# Altium PCB FPGA_Peripheral_Board.PcbDoc (part 4 of 5)
Units mm, origin at the board's own origin, x right, y up, seen from the top; angles counter-clockwise.
Board outline 78.8 x 69 mm, 4 copper layers (Top Layer, Int1 (GND), Int2 (PWR), Bottom Layer), stack 1.508 mm thick; 111 components, 280 nets, 1262 pads, 728 vias.
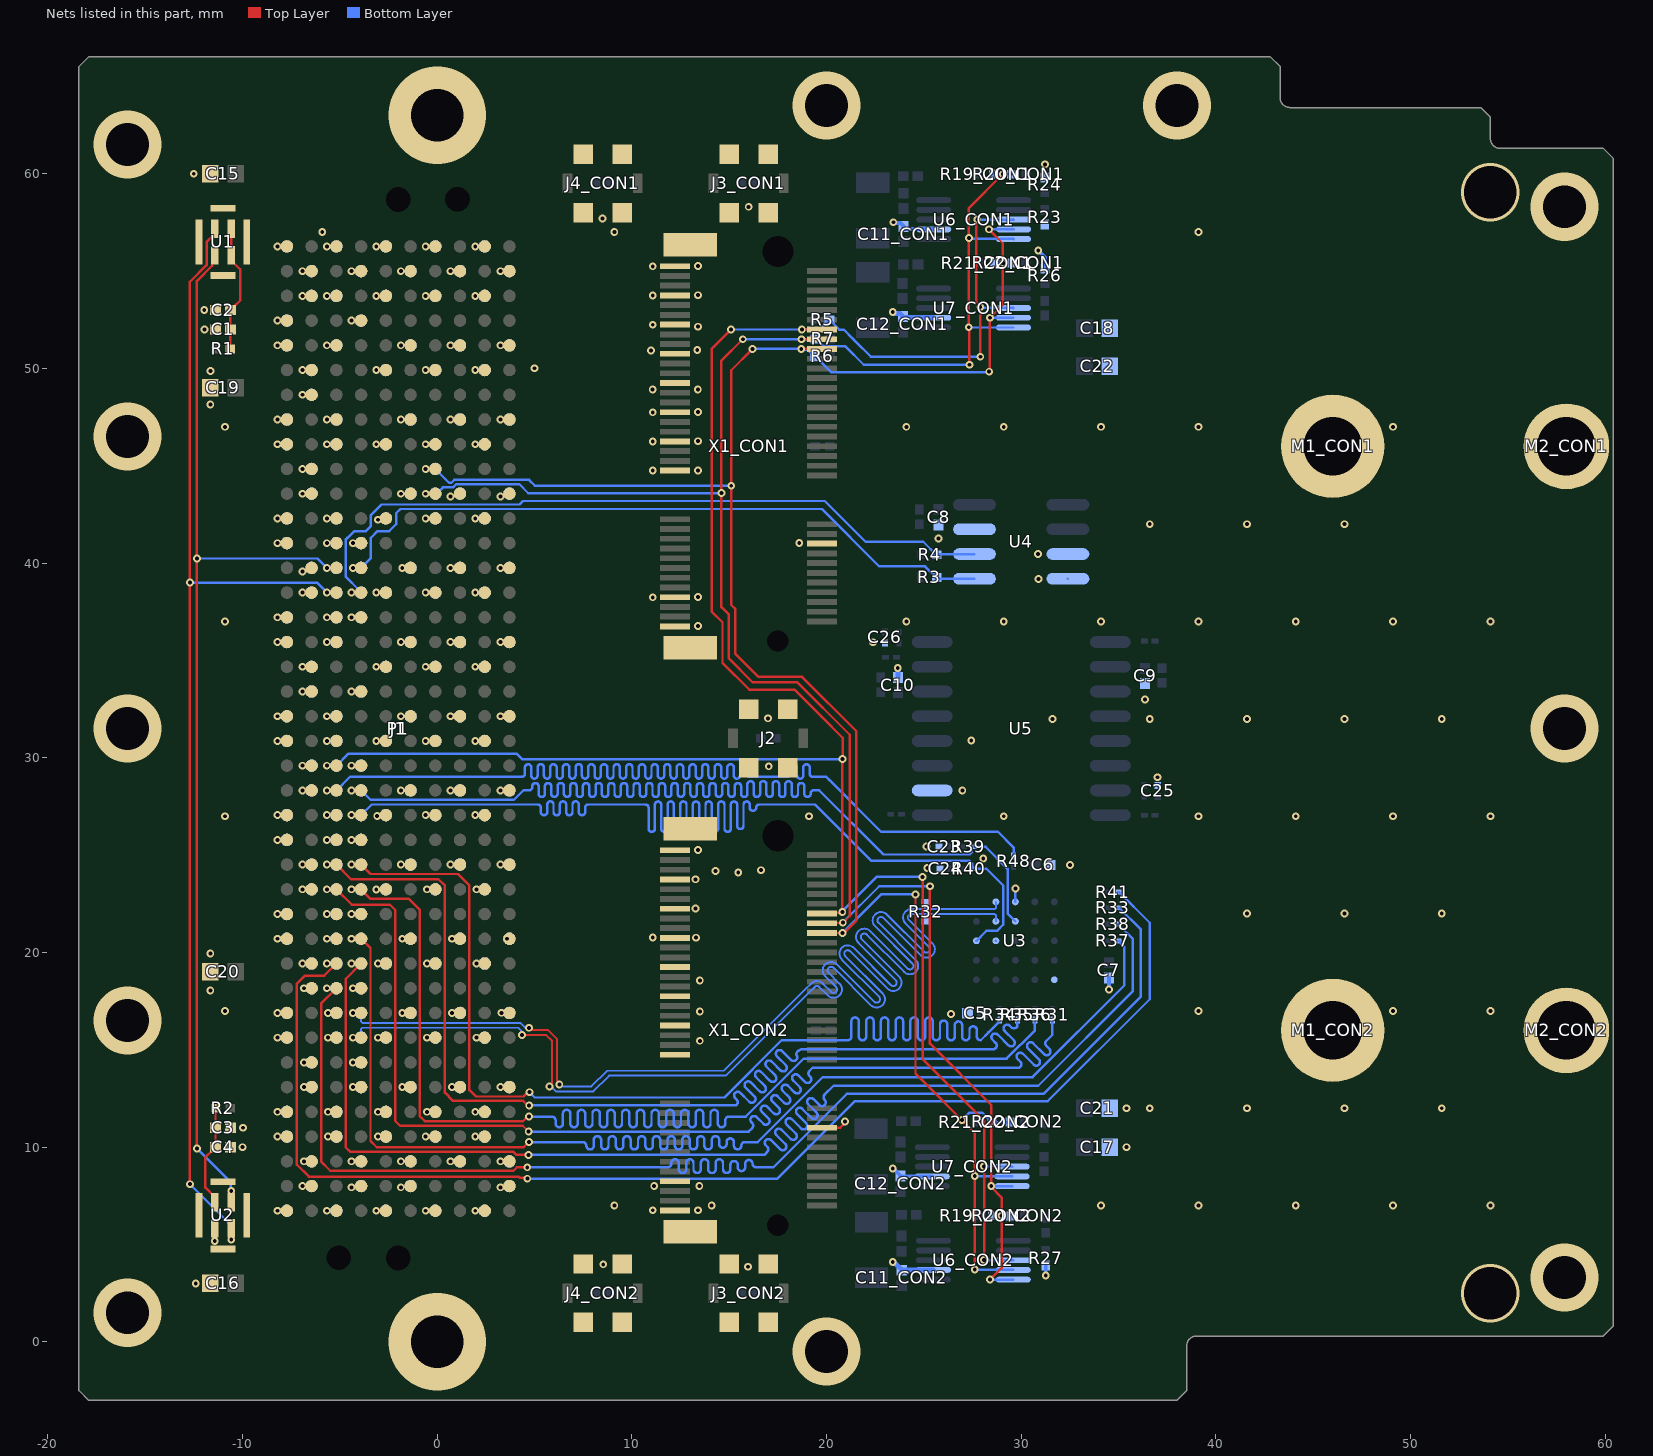
[diagram p5: the nets of this part, all layers, seen from the top]

## Via types
v1: diameter 0.4, hole 0.2, Top Layer to Bottom Layer, tented both sides, 713 vias
v2: diameter 3.5, hole 2.2, Top Layer to Bottom Layer, 11 vias
v3: diameter 5, hole 2.7, Top Layer to Bottom Layer, tented both sides, 2 vias
v4: diameter 3, hole 2.7, Top Layer to Bottom Layer, 1 vias
v5: diameter 3, hole 2.7, Top Layer to Bottom Layer, tented both sides, 1 vias

## Nets (pads, with @x,y where several pads share a name; then routed paths per layer and width w, separated by ;. In a path a pad name is that pad's centre, name@x,y a point inside that pad or via, vN(x,y) a via of type N, cw(c..) or ccw(c..) an arc to the next point about the centre after c; other vN are vias at no path point) (continued)
GND: C1.1 C2.1 C3.1 C4.1 C5.1 C6.1 C7.1 C8.1 C9.1 C10.1 C11_CON1.1 C11_CON2.1 C12_CON1.1 C12_CON2.1 C15.1 C16.1 C17.1 C18.1 C19.1 C20.1 C21.1 C22.1 C23.2 C24.2 C25.2 C26.2 J1.A1 J1.A4 J1.A5 J1.A8 J1.A9 J1.A12 J1.A13 J1.A16 J1.A17 J1.A20 J1.A21 J1.A24 J1.A25 J1.A28 J1.A29 J1.A32 J1.A33 J1.A36 J1.A37 J1.A40 J1.B2 J1.B3 J1.B6 J1.B7 J1.B10 J1.B11 J1.B14 J1.B15 J1.B18 J1.B19 J1.B22 J1.B23 J1.B26 J1.B27 J1.B30 J1.B31 J1.B34 J1.B35 J1.B38 J1.B39 J1.C1 J1.C4 J1.C5 J1.C8 J1.C9 J1.C12 J1.C13 J1.C16 J1.C17 J1.C20 J1.C21 J1.C24 J1.C25 J1.C28 J1.C29 J1.C32 J1.C33 J1.C36 J1.C38 J1.C40 J1.D2 J1.D3 J1.D6 J1.D7 J1.D10 J1.D13 J1.D16 J1.D19 J1.D22 J1.D25 J1.D28 J1.D37 J1.D39 J1.E1 J1.E4 J1.E5 J1.E8 J1.E11 J1.E14 J1.E17 J1.E20 J1.E23 J1.E26 J1.E29 J1.E32 J1.E35 J1.E38 J1.E40 J1.F2 J1.F3 J1.F6 J1.F9 J1.F12 J1.F15 J1.F18 J1.F21 J1.F24 J1.F27 J1.F30 J1.F33 J1.F36 J1.F39 J1.G1 J1.G4 J1.G5 J1.G8 J1.G11 J1.G14 J1.G17 J1.G20 J1.G23 J1.G26 J1.G29 J1.G32 J1.G35 J1.G38 J1.G40 J1.H3 J1.H6 J1.H9 J1.H12 J1.H15 J1.H18 J1.H21 J1.H24 J1.H27 J1.H30 J1.H33 J1.H36 J1.H39 J1.J1 J1.J4 J1.J5 J1.J8 J1.J11 J1.J14 J1.J17 J1.J20 J1.J23 J1.J26 J1.J29 J1.J32 J1.J35 J1.J38 J1.J40 J1.K2 J1.K3 J1.K6 J1.K9 J1.K12 J1.K15 J1.K18 J1.K21 J1.K24 J1.K27 J1.K30 J1.K33 J1.K36 J1.K39 J2.3 J2.4 J2.5 J2.6 J3_CON1.3 J3_CON1.4 J3_CON1.5 J3_CON1.6 J3_CON2.3 J3_CON2.4 J3_CON2.5 J3_CON2.6 J4_CON1.3 J4_CON1.4 J4_CON1.5 J4_CON1.6 J4_CON2.3 J4_CON2.4 J4_CON2.5 J4_CON2.6 M1_CON1.1 M1_CON2.1 M2_CON1.1 M2_CON2.1 P1.A1 P1.A4 P1.A5 P1.A8 P1.A9 P1.A12 P1.A13 P1.A16 P1.A17 P1.A20 P1.A21 P1.A24 P1.A25 P1.A28 P1.A29 P1.A32 P1.A33 P1.A36 P1.A37 P1.A40 P1.B2 P1.B3 P1.B6 P1.B7 P1.B10 P1.B11 P1.B14 P1.B15 P1.B18 P1.B19 P1.B22 P1.B23 P1.B26 P1.B27 P1.B30 P1.B31 P1.B34 P1.B35 P1.B38 P1.B39 P1.C1 P1.C4 P1.C5 P1.C8 P1.C9 P1.C12 P1.C13 P1.C16 P1.C17 P1.C20 P1.C21 P1.C24 P1.C25 P1.C28 P1.C29 P1.C32 P1.C33 P1.C36 P1.C38 P1.C40 P1.D2 P1.D3 P1.D6 P1.D7 P1.D10 P1.D13 P1.D16 P1.D19 P1.D22 P1.D25 P1.D28 P1.D37 P1.D39 P1.E1 P1.E4 P1.E5 P1.E8 P1.E11 P1.E14 P1.E17 P1.E20 P1.E23 P1.E26 P1.E29 P1.E32 P1.E35 P1.E38 P1.E40 P1.F2 P1.F3 P1.F6 P1.F9 P1.F12 P1.F15 P1.F18 P1.F21 P1.F24 P1.F27 P1.F30 P1.F33 P1.F36 P1.F39 P1.G1 P1.G4 P1.G5 P1.G8 P1.G11 P1.G14 P1.G17 P1.G20 P1.G23 P1.G26 P1.G29 P1.G32 P1.G35 P1.G38 P1.G40 P1.H3 P1.H6 P1.H9 P1.H12 P1.H15 P1.H18 P1.H21 P1.H24 P1.H27 P1.H30 P1.H33 P1.H36 P1.H39 P1.J1 P1.J4 P1.J5 P1.J8 P1.J11 P1.J14 P1.J17 P1.J20 P1.J23 P1.J26 P1.J29 P1.J32 P1.J35 P1.J38 P1.J40 P1.K2 P1.K3 P1.K6 P1.K9 P1.K12 P1.K15 P1.K18 P1.K21 P1.K24 P1.K27 P1.K30 P1.K33 P1.K36 P1.K39 R23.1 R24.1 R26.1 R27.1 U1.5 U2.2 U2.5 U3.B3 U3.C1 U3.E5 U4.3 U4.4 U4.7 U5.10 U6_CON1.7 U6_CON2.7 U7_CON1.7 U7_CON2.7 X1_CON1.1 X1_CON1.7 X1_CON1.18 X1_CON1.33 X1_CON1.39 X1_CON1.45 X1_CON1.51 X1_CON1.57 X1_CON1.63 X1_CON1.69 X1_CON1.75 X1_CON1.76 X1_CON1.77 X1_CON2.1 X1_CON2.7 X1_CON2.18 X1_CON2.33 X1_CON2.39 X1_CON2.45 X1_CON2.51 X1_CON2.57 X1_CON2.63 X1_CON2.69 X1_CON2.75 X1_CON2.76 X1_CON2.77 | length 15
  Top Layer w0.125: X1_CON1.69@12.206,53.731 X1_CON1.69@12.225,53.75 ; J2.4@16,32.5 J2.4@16.437,32.062 ; X1_CON2.18@19.775,11 20.7,11 20.948,11.248 v1(20.948,11.313)
  Top Layer w0.2: v1(-11.425,5.175) U2.2@-11.425,5.825
  Bottom Layer w0.125: U3.B3@28.697,20.597 U3.B3@28.7,20.6 ; U3.C1@29.7,22.6 29.704,22.604 29.704,23.288 v1(29.707,23.292) ; v1(30.888,39.177) v1@30.897,39.186 ; U4.4@32.391,39.186 U4.4@32.4,39.195
  Bottom Layer w0.2: v1(23.4,8.9) 23.437,8.9 23.803,8.534 C12_CON2.1@23.803,8.514 23.81,8.507 25.425,8.507 U7_CON2.7@25.432,8.5 ; v1(23.432,57.509) 23.47,57.471 23.8,57.471 23.96,57.311 C11_CON1.1@23.96,57.291 24.089,57.162 25.487,57.162 U6_CON1.7@25.506,57.143 ; v1(30.872,56.055) 31.227,55.7 31.227,55.137 R26.1@31.215,55.125 ; v1(31.262,3.417) R27.1@31.262,3.928 ; v1(34.502,18.102) C7.1@34.502,18.693 ; v1(37,29) v1@37.006,28.994 ; C25.2@37.006,28.598 37,28.593 C25.2@37.011,28.581
  Bottom Layer w0.25: v1(23.401,52.899) 23.441,52.899 23.527,52.814 23.787,52.814 23.922,52.679 C12_CON1.1@23.922,52.659 23.971,52.61 25.49,52.61 U7_CON1.7@25.5,52.6 ; v1(23.403,4.105) 23.457,4.105 23.863,3.699 C11_CON2.1@23.863,3.679 23.872,3.688 25.483,3.688 U6_CON2.7@25.492,3.697 ; v1(23.658,34.615) 23.662,34.611 23.662,34.128 C10.1@23.665,34.125
  other v1: -12.4,3 15.968,3.857 8.53,3.982 -8.2,6.735 -5.665,6.735 -3.126,6.735 -0.59,6.735 1.96,6.735 11.072,6.763 13.392,6.763 9.1,7 14.1,7 34.1,7 39.1,7 44.1,7 49.1,7 54.1,7 -4.395,7.938 -1.865,7.938 3.25,7.938 -6.92,8.005 11.147,8.013 13.467,8.013 -6.837,9.275 -4.395,9.275 -1.865,9.275 0.68,9.275 3.25,9.275 -10,10 35.4,10 -8.2,10.545 -5.6,10.545 -3.037,10.545 -0.59,10.545 1.96,10.545 -9.967,11 -8.2,11.815 -5.6,11.815 -3.037,11.815 -0.52,11.815 1.96,11.815 35.4,12 36.6,12 41.6,12 46.6,12 51.6,12 -6.837,13.085 -4.33,13.085 -1.79,13.085 0.763,13.085 3.25,13.085 -6.837,14.355 -4.33,14.355 13.492,15.463 -8.2,15.625 -5.6,15.625 -3.037,15.625 -0.52,15.625 2.02,15.625 26.388,16.834 -8.2,16.895 -5.6,16.895 -1.79,16.895 0.763,16.895 3.305,16.9 13.492,16.963 -10.9,17 39.1,17 49.1,17 54.1,17 -11.65,18.05 -6.837,18.165 -4.33,18.165 13.492,18.563 -6.92,19.435 -3.037,19.435 -0.52,19.435 2.02,19.435 -11.65,19.95 -8.2,20.705 -5.665,20.705 -1.79,20.705 0.763,20.705 3.595,20.705 13.293,20.761 11.072,20.763 -8.2,21.975 -5.665,21.975 -4.395,21.975 41.6,22 46.6,22 51.6,22 13.269,22.255 -6.92,23.245 -3.126,23.237 -0.52,23.245 2.02,23.245 13.269,23.759 15.466,24.108 14.297,24.186 16.639,24.229 25.171,24.341 -6.92,24.515 -1.865,24.515 0.68,24.515 3.25,24.515 32.5,24.5 28.048,24.826 13.392,25.263 25.139,25.448 -8.2,25.785 -5.665,25.785 -4.395,25.785 -10.9,27 -3.079,27.008 19.1,27 29.1,27 39.1,27 44.1,27 49.1,27 54.1,27 -8.2,27.055 -5.665,27.055 -0.59,27.055 1.96,27.055 -6.92,28.325 -1.865,28.325 0.68,28.325 3.25,28.325 26.975,28.325 17.032,29.563 -6.92,29.595 -4.395,29.595 -8.2,30.865 -5.665,30.865 -3.126,30.865 -0.59,30.865 1.96,30.865 27.434,30.889 31.6,32 36.6,32 41.6,32 46.6,32 51.6,32 17,32.027 -8.2,32.135 -5.665,32.135 -1.865,32.135 0.68,32.135 3.25,32.135 36.356,32.996 -6.92,33.405 -4.395,33.405 -6.92,34.675 -3.126,34.675 -0.59,34.675 1.96,34.675 -8.2,35.945 -5.665,35.945 -1.865,35.945 0.68,35.945 3.25,35.945 22.383,35.94 13.392,36.763 -10.9,37 24.1,37 29.1,37 34.1,37 39.1,37 44.1,37 49.1,37 54.1,37 -8.2,37.215 -5.665,37.215 -4.395,37.215 11.072,38.243 13.392,38.263 -6.92,38.485 -3.126,38.485 -0.59,38.485 1.96,38.485 -6.912,39.565 -1.79,39.755 0.68,39.755 3.25,39.755 30.865,40.465 -8.2,41.025 -5.665,41.025 -4.323,41.025 18.6,41.03 25.758,41.258 36.6,42 41.6,42 46.6,42 -3.037,42.228 -8.2,42.295 -5.665,42.295 -0.59,42.295 1.96,42.295 0.68,43.422 3.25,43.422 -6.92,43.565 -1.865,43.565 11.072,44.763 13.392,44.763 -6.92,44.835 -8.2,46.105 -5.665,46.105 -3.126,46.105 -0.59,46.105 1.96,46.105 11.072,46.243 13.392,46.263 -10.9,47 24.1,47 29.1,47 34.1,47 39.1,47 49.1,47 -8.2,47.375 -5.665,47.375 -1.865,47.375 0.68,47.375 3.25,47.375 11.072,47.743 13.392,47.763 -11.65,48.15 -6.92,48.645 11.069,48.916 13.39,48.916 -11.639,49.861 -6.92,49.915 -3.126,49.915 -0.59,49.915 1.96,49.915 5.006,50.009 10.983,50.922 13.36,50.945 -8.2,51.185 -5.665,51.185 -1.865,51.185 0.68,51.185 3.25,51.185 -11.945,52 13.392,52.144 11.072,52.243 -8.2,52.455 -4.395,52.455 -11.964,53 -6.92,53.725 -5.665,53.725 -3.126,53.725 -0.59,53.725 1.96,53.725 11.072,53.743 13.392,53.763 -6.92,54.995 -4.395,54.995 -1.865,54.995 0.68,54.995 3.25,54.995 11.072,55.243 13.392,55.263 -8.2,56.265 -5.665,56.265 -3.126,56.265 -0.59,56.265 1.96,56.265 -5.9,57 9.1,57 39.1,57 8.5,57.7 16,58.3 -12.5,60 31.214,60.484
  other v2: 20,-0.5 -15.9,1.5 57.9,3.3 -15.9,16.5 -15.9,31.5 57.9,31.5 -15.9,46.5 57.9,58.3 -15.9,61.5 20,63.5 38,63.5
  other v3: 0,0 0,63
  other v4: 54.1,2.5
  other v5: 54.1,59.05
HYPER_CK_N: J1.D9 P1.D9 R32.1 U3.B1 | length 65
  Top Layer w0.1: v1(4.713,16.131) 4.795,16.131 4.916,16.01 5.706,16.01 6.15,15.565 6.15,13.426 6.275,13.301 v1(6.275,13.22)
  Bottom Layer w0.1: P1.D9@-3.905,16.895 -3.905,16.444 -3.846,16.385 4.265,16.385 4.5,16.15 4.694,16.15 v1(4.713,16.131) ; v1(6.275,13.22) 6.356,13.22 6.456,13.12 7.92,13.12 8.727,13.927 14.729,13.927 18.805,18.003 18.928,18.126 cw(c19.017,18.038) 18.929,18.127 19.207,18.404 cw(c19.509,18.103) 19.77,18.442 19.775,18.442 19.811,18.406 cw(c19.509,18.103) 19.812,18.404 20.237,17.98 ccw(c20.362,18.104) 20.487,17.979 ccw(c20.362,18.104) 20.488,18.229 ; 20.487,18.23 19.932,18.785 cw(c20.233,19.088) 19.931,19.39 cw(c20.233,19.088) 20.536,19.389 22.448,17.477 ccw(c22.574,17.601) 22.699,17.476 ; 21.39,20.243 ccw(c21.087,19.942) 20.785,20.244 ccw(c21.087,19.942) 20.786,19.639 22.698,17.727 ; 21.39,20.243 23.302,18.331 ; 22.699,17.726 cw(c22.574,17.601) 22.699,17.476 ; 23.303,18.33 ccw(c23.428,18.455) 23.553,18.33 ; 23.552,18.581 21.64,20.494 cw(c21.941,20.796) 21.639,21.098 cw(c21.941,20.796) 22.244,21.098 24.156,19.185 ccw(c24.282,19.309) 24.407,19.184 ; 23.554,18.33 ccw(c23.428,18.455) 23.553,18.58 ; 24.407,19.435 22.494,21.348 cw(c22.796,21.65) 22.494,21.952 cw(c22.796,21.65) 23.098,21.952 25.011,20.039 ccw(c25.136,20.164) 25.262,20.039 ccw(c25.136,20.164) 25.262,20.289 24.055,21.495 cw(c24.356,21.798) 24.356,22.225 24.604,22.225 28.641,22.225 28.7,22.284 U3.B1@28.7,22.6 ; 24.408,19.185 ccw(c24.282,19.309) 24.407,19.435
  other v1: -4.33,16.895
HYPER_CK_P: J1.D8 P1.D8 R32.2 U3.B2 | length 65.3
  Top Layer w0.1: v1(4.36,15.76) 5.602,15.76 5.9,15.462 5.9,13.321 5.775,13.196 v1(5.775,13.115)
  Bottom Layer w0.1: P1.D8@-3.905,15.625 -3.905,16.076 -3.846,16.135 4.161,16.135 4.323,15.973 4.323,15.796 v1(4.36,15.76) ; v1(5.775,13.115) 5.849,13.115 6.094,12.87 8.024,12.87 8.83,13.677 14.833,13.677 18.982,17.826 19.105,17.949 ccw(c19.017,18.038) 19.106,17.95 19.384,18.227 cw(c19.509,18.103) 19.635,18.227 20.06,17.803 ccw(c20.362,18.104) 20.664,17.802 ccw(c20.362,18.104) 20.664,18.407 20.109,18.962 ; 20.108,18.962 cw(c20.233,19.088) 20.107,19.213 ; 20.108,19.213 cw(c20.233,19.088) 20.358,19.213 ; 20.359,19.212 22.271,17.3 ccw(c22.574,17.601) 22.876,17.299 ccw(c22.574,17.601) 22.875,17.904 20.963,19.816 ; 20.962,20.067 ccw(c21.087,19.942) 20.962,19.816 ; 20.962,20.068 cw(c21.087,19.942) 21.212,20.067 ; 21.213,20.066 23.126,18.154 ccw(c23.428,18.455) 23.73,18.153 ccw(c23.428,18.455) 23.729,18.758 21.817,20.67 cw(c21.941,20.796) 21.816,20.921 ; 21.817,20.922 cw(c21.941,20.796) 22.067,20.921 ; 22.067,20.92 23.98,19.008 ccw(c24.282,19.309) 24.584,19.008 ccw(c24.282,19.309) 24.584,19.612 22.671,21.525 cw(c22.796,21.65) 22.67,21.775 ; 22.671,21.776 cw(c22.796,21.65) 22.921,21.776 ; 22.922,21.775 24.834,19.862 ccw(c25.136,20.164) 25.438,19.861 ccw(c25.136,20.164) 25.438,20.466 ; 25.438,20.466 24.232,21.672 cw(c24.356,21.798) 24.356,21.975 24.854,21.975 28.641,21.975 28.7,21.916 U3.B2@28.7,21.6
  other v1: -4.33,15.625
HYPER_CSN0: J1.D18 P1.D18 R39.1 U3.C2 | length 64.7
  Bottom Layer w0.125: P1.D18@-3.905,28.325 -3.905,28.205 -3.785,28.205 -3.423,27.842 3.942,27.842 4.434,28.334 4.723,28.334 ccw(c4.723,28.497) 4.885,28.497 4.885,28.543 cw(c5.048,28.543) 5.048,28.705 cw(c5.048,28.543) 5.21,28.543 5.21,28.152 ccw(c5.373,28.152) 5.373,27.989 ccw(c5.373,28.152) 5.535,28.152 5.535,28.543 cw(c5.698,28.543) 5.698,28.705 cw(c5.698,28.543) 5.86,28.543 5.86,28.152 ccw(c6.023,28.152) 6.023,27.989 ccw(c6.023,28.152) 6.185,28.152 6.185,28.543 cw(c6.348,28.543) 6.348,28.705 cw(c6.348,28.543) 6.51,28.543 6.51,28.152 ccw(c6.673,28.152) 6.673,27.989 ccw(c6.673,28.152) 6.835,28.152 6.835,28.543 cw(c6.998,28.543) 6.998,28.705 cw(c6.998,28.543) 7.16,28.543 7.16,28.152 ccw(c7.323,28.152) 7.323,27.989 ccw(c7.323,28.152) 7.485,28.152 7.485,28.543 cw(c7.648,28.543) 7.648,28.705 cw(c7.648,28.543) 7.81,28.543 7.81,28.152 ccw(c7.973,28.152) 7.973,27.989 ccw(c7.973,28.152) 8.135,28.152 8.135,28.543 cw(c8.298,28.543) 8.298,28.705 cw(c8.298,28.543) 8.46,28.543 8.46,28.152 ccw(c8.623,28.152) 8.623,27.989 ccw(c8.623,28.152) 8.785,28.152 8.785,28.543 cw(c8.948,28.543) 8.948,28.705 cw(c8.948,28.543) 9.11,28.543 9.11,28.152 ccw(c9.273,28.152) 9.273,27.989 ccw(c9.273,28.152) 9.435,28.152 9.435,28.543 cw(c9.598,28.543) 9.598,28.705 cw(c9.598,28.543) 9.76,28.543 9.76,28.152 ccw(c9.923,28.152) 9.923,27.989 ccw(c9.923,28.152) 10.085,28.152 10.085,28.543 cw(c10.248,28.543) 10.248,28.705 cw(c10.248,28.543) 10.41,28.543 10.41,28.152 ccw(c10.573,28.152) 10.573,27.989 ccw(c10.573,28.152) 10.735,28.152 10.735,28.543 cw(c10.898,28.543) 10.898,28.705 cw(c10.898,28.543) 11.06,28.543 11.06,28.152 ccw(c11.223,28.152) 11.223,27.989 ccw(c11.223,28.152) 11.385,28.152 11.385,28.543 cw(c11.548,28.543) 11.548,28.705 cw(c11.548,28.543) 11.71,28.543 11.71,28.152 ccw(c11.873,28.152) 11.873,27.989 ccw(c11.873,28.152) 12.035,28.152 12.035,28.543 cw(c12.198,28.543) 12.198,28.705 cw(c12.198,28.543) 12.36,28.543 12.36,28.152 ccw(c12.523,28.152) 12.523,27.989 ccw(c12.523,28.152) 12.685,28.152 12.685,28.543 cw(c12.848,28.543) 12.848,28.705 cw(c12.848,28.543) 13.01,28.543 13.01,28.152 ccw(c13.173,28.152) 13.173,27.989 ccw(c13.173,28.152) 13.335,28.152 13.335,28.543 cw(c13.498,28.543) 13.498,28.705 cw(c13.498,28.543) 13.66,28.543 13.66,28.152 ccw(c13.823,28.152) 13.823,27.989 ccw(c13.823,28.152) 13.985,28.152 13.985,28.543 cw(c14.148,28.543) 14.148,28.705 cw(c14.148,28.543) 14.31,28.543 14.31,28.152 ccw(c14.473,28.152) 14.473,27.989 ccw(c14.473,28.152) 14.635,28.152 14.635,28.543 cw(c14.798,28.543) 14.798,28.705 cw(c14.798,28.543) 14.96,28.543 14.96,28.152 ccw(c15.123,28.152) 15.123,27.989 ccw(c15.123,28.152) 15.285,28.152 15.285,28.543 cw(c15.448,28.543) 15.448,28.705 cw(c15.448,28.543) 15.61,28.543 15.61,28.152 ccw(c15.773,28.152) 15.773,27.989 ccw(c15.773,28.152) 15.935,28.152 15.935,28.637 cw(c16.098,28.637) 16.098,28.799 cw(c16.098,28.637) 16.26,28.637 16.26,28.152 ccw(c16.423,28.152) 16.423,27.989 ccw(c16.423,28.152) 16.585,28.152 16.585,28.637 cw(c16.748,28.637) 16.748,28.799 cw(c16.748,28.637) 16.91,28.637 16.91,28.152 ccw(c17.073,28.152) 17.073,27.989 ccw(c17.073,28.152) 17.235,28.152 17.235,28.637 cw(c17.398,28.637) 17.398,28.799 cw(c17.398,28.637) 17.56,28.637 17.56,28.152 ccw(c17.723,28.152) 17.723,27.989 ccw(c17.723,28.152) 17.885,28.152 17.885,28.637 cw(c18.048,28.637) 18.048,28.799 cw(c18.048,28.637) 18.21,28.637 18.21,28.152 ccw(c18.373,28.152) 18.373,27.989 ccw(c18.373,28.152) 18.535,28.152 18.535,28.543 cw(c18.698,28.543) 18.698,28.705 cw(c18.698,28.543) 18.86,28.543 18.86,28.152 ccw(c19.023,28.152) 19.023,27.989 ccw(c19.023,28.152) 19.185,28.152 19.185,28.172 cw(c19.348,28.172) 19.348,28.334 19.41,28.334 19.621,28.334 22.92,25.035 27.349,25.035 27.452,25.138 27.452,25.37 27.514,25.433 R39.1@27.564,25.433 28.167,25.433 29.304,24.296 29.304,21.996 U3.C2@29.7,21.6
  other v1: -4.395,28.325
HYPER_CSN1: J1.D17 P1.D17 R40.1 U3.A3 | length 65.9
  Bottom Layer w0.125: P1.D17@-3.905,27.055 -3.36,27.6 4.777,27.6 5.165,27.6 cw(c5.165,27.438) 5.328,27.438 5.328,27.21 ccw(c5.49,27.21) 5.49,27.047 ccw(c5.49,27.21) 5.653,27.21 5.653,27.602 cw(c5.815,27.602) 5.815,27.764 cw(c5.815,27.602) 5.978,27.602 5.978,27.21 ccw(c6.14,27.21) 6.14,27.047 ccw(c6.14,27.21) 6.303,27.21 6.303,27.602 cw(c6.465,27.602) 6.465,27.764 cw(c6.465,27.602) 6.628,27.602 6.628,27.21 ccw(c6.79,27.21) 6.79,27.047 ccw(c6.79,27.21) 6.953,27.21 6.953,27.602 cw(c7.115,27.602) 7.115,27.764 cw(c7.115,27.602) 7.278,27.602 7.278,27.21 ccw(c7.44,27.21) 7.44,27.047 ccw(c7.44,27.21) 7.603,27.21 7.603,27.438 cw(c7.765,27.438) 7.765,27.6 8.208,27.6 10.309,27.6 10.696,27.6 cw(c10.696,27.438) 10.859,27.438 10.859,26.361 ccw(c11.021,26.361) 11.021,26.199 ccw(c11.021,26.361) 11.184,26.361 11.184,27.595 cw(c11.346,27.595) 11.346,27.758 cw(c11.346,27.595) 11.509,27.595 11.509,26.361 ccw(c11.671,26.361) 11.671,26.199 ccw(c11.671,26.361) 11.834,26.361 11.834,27.595 cw(c11.996,27.595) 11.996,27.758 cw(c11.996,27.595) 12.159,27.595 12.159,26.361 ccw(c12.321,26.361) 12.321,26.199 ccw(c12.321,26.361) 12.484,26.361 12.484,27.595 cw(c12.646,27.595) 12.646,27.758 cw(c12.646,27.595) 12.809,27.595 12.809,26.361 ccw(c12.971,26.361) 12.971,26.199 ccw(c12.971,26.361) 13.134,26.361 13.134,27.595 cw(c13.296,27.595) 13.296,27.758 cw(c13.296,27.595) 13.459,27.595 13.459,26.361 ccw(c13.621,26.361) 13.621,26.199 ccw(c13.621,26.361) 13.784,26.361 13.784,27.595 cw(c13.946,27.595) 13.946,27.758 cw(c13.946,27.595) 14.109,27.595 14.109,26.361 ccw(c14.271,26.361) 14.271,26.199 ccw(c14.271,26.361) 14.434,26.361 14.434,27.595 cw(c14.596,27.595) 14.596,27.758 cw(c14.596,27.595) 14.759,27.595 14.759,26.361 ccw(c14.921,26.361) 14.921,26.199 ccw(c14.921,26.361) 15.084,26.361 15.084,27.595 cw(c15.246,27.595) 15.246,27.758 cw(c15.246,27.595) 15.409,27.595 15.409,26.505 ccw(c15.571,26.505) 15.571,26.342 ccw(c15.571,26.505) 15.734,26.505 15.734,27.595 cw(c15.896,27.595) 15.896,27.758 cw(c15.896,27.595) 16.059,27.595 16.059,27.437 ccw(c16.221,27.437) 16.221,27.275 ccw(c16.221,27.437) 16.384,27.437 cw(c16.546,27.438) 16.546,27.6 17.3,27.6 19.405,27.6 22.283,24.722 27.318,24.722 27.474,24.566 27.474,24.362 27.536,24.3 R40.1@27.575,24.3 28.213,24.3 29.079,23.435 29.079,21.432 28.753,21.106 28.206,21.106 U3.A3@27.7,20.6
  other v1: -4.395,27.055
HYPER_D0: J1.C14 P1.C14 R31.1 | length 61.7
  Top Layer w0.125: J1.C14@-5.175,23.245 -5.145,23.245 -5.145,23.215 -4.388,22.457 -2.435,22.457 -2.153,22.175 -2.153,11.352 -1.9,11.1 4.4,11.1 v1(4.7,10.8)
  Bottom Layer w0.125: v1(4.7,10.8) 16,10.8 16.133,10.933 16.177,10.977 ccw(c16.043,11.111) 16.177,11.245 16.144,11.278 cw(c16.278,11.412) 16.144,11.546 cw(c16.278,11.412) 16.412,11.546 16.749,11.208 ccw(c16.883,11.342) 17.017,11.208 ccw(c16.883,11.342) 17.017,11.476 16.68,11.814 cw(c16.814,11.948) 16.68,12.082 cw(c16.814,11.948) 16.948,12.082 17.285,11.744 ccw(c17.419,11.878) 17.553,11.744 ccw(c17.419,11.878) 17.553,12.012 17.216,12.35 cw(c17.35,12.484) 17.216,12.618 cw(c17.35,12.484) 17.484,12.618 17.821,12.28 ccw(c17.955,12.414) 18.089,12.28 ccw(c17.955,12.414) 18.089,12.548 17.752,12.886 cw(c17.886,13.02) 17.752,13.154 cw(c17.886,13.02) 18.02,13.154 18.357,12.816 ccw(c18.491,12.95) 18.625,12.816 ccw(c18.491,12.95) 18.625,13.084 18.288,13.422 cw(c18.422,13.556) 18.288,13.69 cw(c18.422,13.556) 18.556,13.69 18.893,13.352 ccw(c19.027,13.486) 19.161,13.352 ccw(c19.027,13.486) 19.161,13.62 19.125,13.657 cw(c19.259,13.791) 19.125,13.925 19.282,14.082 19.416,14.082 29.909,14.082 29.953,14.127 ccw(c29.819,14.261) 29.953,14.395 29.817,14.531 cw(c29.951,14.665) 29.817,14.799 cw(c29.951,14.665) 30.085,14.799 30.641,14.243 ccw(c30.775,14.377) 30.909,14.243 ccw(c30.775,14.377) 30.909,14.511 30.353,15.067 cw(c30.487,15.201) 30.353,15.335 cw(c30.487,15.201) 30.621,15.335 31.177,14.779 ccw(c31.311,14.913) 31.445,14.779 ccw(c31.311,14.913) 31.445,15.047 31.293,15.199 cw(c31.427,15.333) 31.293,15.467 31.6,15.774 R31.1@31.6,16.525
  other v1: -5.665,23.245
HYPER_D1: J1.C10 P1.C10 R33.1 | length 65.8
  Top Layer w0.125: J1.C10@-5.175,18.165 -5.963,17.377 -5.963,9.263 -5.492,8.792 3.915,8.792 4.087,8.965 v1(4.626,8.965)
  Bottom Layer w0.125: v1(4.626,8.965) 11.778,8.965 11.84,8.965 ccw(c11.84,9.154) 12.03,9.154 12.03,9.19 cw(c12.219,9.19) 12.219,9.38 cw(c12.219,9.19) 12.409,9.19 12.409,8.863 ccw(c12.598,8.863) 12.598,8.673 ccw(c12.598,8.863) 12.788,8.863 12.788,9.19 cw(c12.977,9.19) 12.977,9.38 cw(c12.977,9.19) 13.167,9.19 13.167,8.863 ccw(c13.356,8.863) 13.356,8.673 ccw(c13.356,8.863) 13.546,8.863 13.546,9.19 cw(c13.735,9.19) 13.735,9.38 cw(c13.735,9.19) 13.925,9.19 13.925,8.863 ccw(c14.114,8.863) 14.114,8.673 ccw(c14.114,8.863) 14.304,8.863 14.304,9.19 cw(c14.493,9.19) 14.493,9.38 cw(c14.493,9.19) 14.683,9.19 14.683,8.863 ccw(c14.872,8.863) 14.872,8.673 ccw(c14.872,8.863) 15.062,8.863 15.062,9.102 cw(c15.251,9.102) 15.251,9.291 cw(c15.251,9.102) 15.441,9.102 15.441,8.965 ccw(c15.63,8.965) 15.63,8.775 ccw(c15.63,8.965) 15.82,8.965 15.82,9.154 cw(c16.009,9.154) 16.009,9.344 cw(c16.009,9.154) 16.199,9.154 ccw(c16.388,9.154) 16.388,8.965 16.943,8.965 17.265,8.965 21.041,12.741 31.141,12.741 36.148,17.748 36.148,21.177 35.025,22.3 R33.1@34.975,22.3
  other v1: -5.665,18.165
HYPER_D2: J1.D15 P1.D15 R34.1 | length 62.3
  Top Layer w0.125: J1.D15@-3.905,24.515 -3.423,24.032 1.069,24.032 1.374,23.727 ; 1.375,23.727 1.657,23.445 1.657,12.935 1.99,12.602 4.438,12.602 4.662,12.827 v1(4.737,12.827)
  Bottom Layer w0.125: v1(4.737,12.827) 5.013,12.551 14.751,12.551 17.696,15.496 21.027,15.496 21.089,15.496 ccw(c21.089,15.685) 21.279,15.685 21.279,16.474 cw(c21.468,16.474) 21.468,16.664 cw(c21.468,16.474) 21.658,16.474 21.658,15.684 ccw(c21.847,15.684) 21.847,15.494 ccw(c21.847,15.684) 22.037,15.684 22.037,16.474 cw(c22.226,16.474) 22.226,16.664 cw(c22.226,16.474) 22.416,16.474 22.416,15.684 ccw(c22.605,15.684) 22.605,15.494 ccw(c22.605,15.684) 22.795,15.684 22.795,16.474 cw(c22.984,16.474) 22.984,16.664 cw(c22.984,16.474) 23.174,16.474 23.174,15.684 ccw(c23.363,15.684) 23.363,15.494 ccw(c23.363,15.684) 23.553,15.684 23.553,16.474 cw(c23.742,16.474) 23.742,16.664 cw(c23.742,16.474) 23.932,16.474 23.932,15.684 ccw(c24.121,15.684) 24.121,15.494 ccw(c24.121,15.684) 24.311,15.684 24.311,16.474 cw(c24.5,16.474) 24.5,16.664 cw(c24.5,16.474) 24.69,16.474 24.69,15.684 ccw(c24.879,15.684) 24.879,15.494 ccw(c24.879,15.684) 25.069,15.684 25.069,16.474 cw(c25.258,16.474) 25.258,16.664 cw(c25.258,16.474) 25.448,16.474 25.448,15.684 ccw(c25.637,15.684) 25.637,15.494 ccw(c25.637,15.684) 25.827,15.684 25.827,16.315 cw(c26.016,16.315) 26.016,16.504 cw(c26.016,16.315) 26.206,16.315 26.206,15.684 ccw(c26.395,15.684) 26.395,15.494 ccw(c26.395,15.684) 26.585,15.684 26.585,16.269 cw(c26.774,16.269) 26.774,16.458 cw(c26.774,16.269) 26.964,16.269 26.964,15.684 ccw(c27.153,15.684) 27.153,15.494 ccw(c27.153,15.684) 27.343,15.684 27.343,16.018 cw(c27.532,16.018) 27.532,16.207 cw(c27.532,16.018) 27.722,16.018 27.722,15.685 ccw(c27.911,15.685) 27.911,15.496 27.919,15.496 28.317,15.894 28.836,16.412 28.838,16.412 28.9,16.475 R34.1@28.9,16.525
  other v1: -4.395,24.515
HYPER_D3: J1.C15 P1.C15 R35.1 | length 59
  Top Layer w0.125: J1.C15@-5.175,24.515 -4.422,23.762 0.07,23.762 0.4,23.432 0.4,12.8 0.823,12.377 4.421,12.377 4.653,12.146 v1(4.727,12.146)
  Bottom Layer w0.125: v1(4.727,12.146) 15.329,12.146 15.346,12.146 15.382,12.182 ccw(c15.248,12.316) 15.382,12.45 15.309,12.522 cw(c15.443,12.656) 15.309,12.79 cw(c15.443,12.656) 15.577,12.79 16.03,12.337 ccw(c16.164,12.471) 16.298,12.337 ccw(c16.164,12.471) 16.298,12.605 15.845,13.058 cw(c15.979,13.192) 15.845,13.326 cw(c15.979,13.192) 16.113,13.326 16.566,12.873 ccw(c16.7,13.007) 16.834,12.873 ccw(c16.7,13.007) 16.834,13.141 16.381,13.594 cw(c16.515,13.728) 16.381,13.862 cw(c16.515,13.728) 16.649,13.862 17.102,13.409 ccw(c17.236,13.543) 17.37,13.409 ccw(c17.236,13.543) 17.37,13.677 16.917,14.13 cw(c17.051,14.264) 16.917,14.398 cw(c17.051,14.264) 17.185,14.398 17.638,13.945 ccw(c17.772,14.079) 17.906,13.945 ccw(c17.772,14.079) 17.906,14.213 17.453,14.666 cw(c17.587,14.8) 17.453,14.934 cw(c17.587,14.8) 17.721,14.934 18.174,14.481 ccw(c18.308,14.615) 18.442,14.481 ccw(c18.308,14.615) 18.442,14.749 cw(c18.764,14.711) 18.699,15.028 19.341,15.028 28.39,15.028 28.628,15.028 28.687,15.087 ccw(c28.553,15.221) 28.687,15.355 28.526,15.516 cw(c28.66,15.65) 28.526,15.784 cw(c28.66,15.65) 28.794,15.784 29.346,15.232 ccw(c29.48,15.366) 29.614,15.232 ccw(c29.48,15.366) 29.614,15.5 29.143,15.971 cw(c29.277,16.105) 29.143,16.239 cw(c29.277,16.105) 29.411,16.239 29.491,16.159 ccw(c29.625,16.293) 29.759,16.159 29.8,16.2 29.8,16.5 R35.1@29.8,16.525
  other v1: -5.665,24.515
HYPER_D4: J1.D14 P1.D14 R36.1 | length 65.1
  Top Layer w0.125: J1.D14@-3.905,23.245 -3.414,22.754 -1.449,22.754 -0.883,22.188 -0.883,11.583 -0.632,11.332 4.403,11.332 4.641,11.57 v1(4.714,11.57)
  Bottom Layer w0.125: v1(4.714,11.57) 5.452,11.57 5.894,11.57 cw(c5.894,11.381) 6.083,11.381 6.083,11.215 ccw(c6.273,11.215) 6.273,11.025 ccw(c6.273,11.215) 6.462,11.215 6.462,11.731 cw(c6.652,11.731) 6.652,11.921 cw(c6.652,11.731) 6.841,11.731 6.841,11.215 ccw(c7.031,11.215) 7.031,11.025 ccw(c7.031,11.215) 7.22,11.215 7.22,11.731 cw(c7.41,11.731) 7.41,11.921 cw(c7.41,11.731) 7.599,11.731 7.599,11.215 ccw(c7.789,11.215) 7.789,11.025 ccw(c7.789,11.215) 7.978,11.215 7.978,11.731 cw(c8.168,11.731) 8.168,11.921 cw(c8.168,11.731) 8.357,11.731 8.357,11.215 ccw(c8.547,11.215) 8.547,11.025 ccw(c8.547,11.215) 8.736,11.215 8.736,11.731 cw(c8.926,11.731) 8.926,11.921 cw(c8.926,11.731) 9.115,11.731 9.115,11.215 ccw(c9.305,11.215) 9.305,11.025 ccw(c9.305,11.215) 9.494,11.215 9.494,11.731 cw(c9.684,11.731) 9.684,11.921 cw(c9.684,11.731) 9.873,11.731 9.873,11.215 ccw(c10.063,11.215) 10.063,11.025 ccw(c10.063,11.215) 10.252,11.215 10.252,11.731 cw(c10.442,11.731) 10.442,11.921 cw(c10.442,11.731) 10.631,11.731 10.631,11.215 ccw(c10.821,11.215) 10.821,11.025 ccw(c10.821,11.215) 11.01,11.215 11.01,11.731 cw(c11.2,11.731) 11.2,11.921 cw(c11.2,11.731) 11.389,11.731 11.389,11.215 ccw(c11.579,11.215) 11.579,11.025 ccw(c11.579,11.215) 11.768,11.215 11.768,11.731 cw(c11.958,11.731) 11.958,11.921 cw(c11.958,11.731) 12.147,11.731 12.147,11.215 ccw(c12.337,11.215) 12.337,11.025 ccw(c12.337,11.215) 12.526,11.215 12.526,11.731 cw(c12.716,11.731) 12.716,11.921 cw(c12.716,11.731) 12.905,11.731 12.905,11.215 ccw(c13.095,11.215) 13.095,11.025 ccw(c13.095,11.215) 13.284,11.215 13.284,11.731 cw(c13.474,11.731) 13.474,11.921 cw(c13.474,11.731) 13.663,11.731 13.663,11.215 ccw(c13.853,11.215) 13.853,11.025 ccw(c13.853,11.215) 14.042,11.215 14.042,11.731 cw(c14.232,11.731) 14.232,11.921 cw(c14.232,11.731) 14.421,11.731 14.421,11.215 ccw(c14.611,11.215) 14.611,11.025 ccw(c14.611,11.215) 14.8,11.215 14.8,11.381 cw(c14.99,11.381) 14.99,11.57 15.744,11.57 15.85,11.57 18.831,14.551 29.251,14.551 30.7,16 R36.1@30.7,16.525
  other v1: -4.395,23.245
HYPER_D5: J1.D12 P1.D12 R37.1 | length 65.8
  Top Layer w0.125: J1.D12@-3.905,20.705 -3.423,20.222 -3.423,10.322 -3.1,10 4.44,10 4.703,10.264 v1(4.724,10.264)
  Bottom Layer w0.125: v1(4.724,10.264) 7.033,10.264 7.474,10.264 cw(c7.474,10.074) 7.664,10.074 7.664,10.072 ccw(c7.853,10.072) 7.853,9.882 ccw(c7.853,10.072) 8.043,10.072 8.043,10.378 cw(c8.232,10.378) 8.232,10.567 cw(c8.232,10.378) 8.422,10.378 8.422,10.072 ccw(c8.611,10.072) 8.611,9.882 ccw(c8.611,10.072) 8.801,10.072 8.801,10.378 cw(c8.99,10.378) 8.99,10.567 cw(c8.99,10.378) 9.18,10.378 9.18,10.072 ccw(c9.369,10.072) 9.369,9.882 ccw(c9.369,10.072) 9.559,10.072 9.559,10.378 cw(c9.748,10.378) 9.748,10.567 cw(c9.748,10.378) 9.938,10.378 9.938,10.072 ccw(c10.127,10.072) 10.127,9.882 ccw(c10.127,10.072) 10.317,10.072 10.317,10.378 cw(c10.506,10.378) 10.506,10.567 cw(c10.506,10.378) 10.696,10.378 10.696,10.072 ccw(c10.885,10.072) 10.885,9.882 ccw(c10.885,10.072) 11.075,10.072 11.075,10.378 cw(c11.264,10.378) 11.264,10.567 cw(c11.264,10.378) 11.454,10.378 11.454,10.072 ccw(c11.643,10.072) 11.643,9.882 ccw(c11.643,10.072) 11.833,10.072 11.833,10.378 cw(c12.022,10.378) 12.022,10.567 cw(c12.022,10.378) 12.212,10.378 12.212,10.072 ccw(c12.401,10.072) 12.401,9.882 ccw(c12.401,10.072) 12.591,10.072 12.591,10.378 cw(c12.78,10.378) 12.78,10.567 cw(c12.78,10.378) 12.97,10.378 12.97,10.072 ccw(c13.159,10.072) 13.159,9.882 ccw(c13.159,10.072) 13.349,10.072 13.349,10.378 cw(c13.538,10.378) 13.538,10.567 cw(c13.538,10.378) 13.728,10.378 13.728,10.072 ccw(c13.917,10.072) 13.917,9.882 ccw(c13.917,10.072) 14.107,10.072 14.107,10.378 cw(c14.296,10.378) 14.296,10.567 cw(c14.296,10.378) 14.486,10.378 14.486,10.162 ccw(c14.675,10.162) 14.675,9.972 ccw(c14.675,10.162) 14.865,10.162 14.865,10.264 cw(c15.054,10.264) 15.054,10.453 cw(c15.054,10.264) 15.244,10.264 15.244,10.074 ccw(c15.433,10.074) 15.433,9.885 ccw(c15.433,10.074) 15.623,10.074 cw(c15.812,10.074) 15.812,10.264 16.093,10.264 16.464,10.264 19.803,13.603 30.587,13.603 35.3,18.316 35.3,20.275 35.087,20.488 35.087,20.538 35.025,20.6 R37.1@34.975,20.6
  other v1: -4.395,20.705
HYPER_D6: J1.D11 P1.D11 R38.1 | length 65.7
  Top Layer w0.125: J1.D11@-3.905,19.435 -4.693,18.647 -4.693,9.993 -4.475,9.775 3.897,9.775 4.067,9.605 v1(4.69,9.605)
  Bottom Layer w0.125: v1(4.69,9.605) 16.805,9.605 16.909,9.709 16.953,9.753 ccw(c16.819,9.887) 16.953,10.021 16.88,10.094 cw(c17.014,10.228) 16.88,10.362 cw(c17.014,10.228) 17.148,10.362 17.612,9.898 ccw(c17.746,10.032) 17.88,9.898 ccw(c17.746,10.032) 17.88,10.166 17.416,10.63 cw(c17.55,10.764) 17.416,10.898 cw(c17.55,10.764) 17.684,10.898 18.148,10.434 ccw(c18.282,10.568) 18.416,10.434 ccw(c18.282,10.568) 18.416,10.702 17.952,11.166 cw(c18.086,11.3) 17.952,11.434 cw(c18.086,11.3) 18.22,11.434 18.684,10.97 ccw(c18.818,11.104) 18.952,10.97 ccw(c18.818,11.104) 18.952,11.238 18.488,11.702 cw(c18.622,11.836) 18.488,11.97 cw(c18.622,11.836) 18.756,11.97 19.22,11.506 ccw(c19.354,11.64) 19.488,11.506 ccw(c19.354,11.64) 19.488,11.774 19.059,12.203 cw(c19.193,12.337) 19.059,12.471 cw(c19.193,12.337) 19.327,12.471 19.633,12.165 ccw(c19.767,12.299) 19.901,12.165 ccw(c19.767,12.299) 19.901,12.433 cw(c20.035,12.567) 19.901,12.701 20.357,13.157 21.029,13.157 30.874,13.157 35.732,18.015 35.732,20.699 35.083,21.349 35.083,21.399 35.02,21.461 R38.1@34.97,21.461
  other v1: -4.395,19.435
HYPER_D7: J1.C11 P1.C11 R41.1 | length 65.9
  Top Layer w0.125: J1.C11@-5.175,19.435 -5.797,18.813 -6.787,18.813 -7.2,18.4 -7.2,9.1 -6.587,8.487 4.184,8.487 4.246,8.425 4.591,8.425 v1(4.634,8.383)
  Bottom Layer w0.125: v1(4.634,8.383) 17.483,8.383 21.463,12.363 31.363,12.363 36.6,17.6 36.6,21.525 35.025,23.1 R41.1@34.975,23.1
  other v1: -5.665,19.435
HYPER_RWDS: J1.C18 P1.C18 R48.1 | length 60.6
  Bottom Layer w0.125: P1.C18@-5.175,28.325 -4.476,29.024 4.284,29.024 4.347,29.024 ccw(c4.347,29.187) 4.509,29.187 4.509,29.506 cw(c4.672,29.506) 4.672,29.668 cw(c4.672,29.506) 4.834,29.506 4.834,29.093 ccw(c4.997,29.093) 4.997,28.93 ccw(c4.997,29.093) 5.159,29.093 5.159,29.506 cw(c5.322,29.506) 5.322,29.668 cw(c5.322,29.506) 5.484,29.506 5.484,29.093 ccw(c5.647,29.093) 5.647,28.93 ccw(c5.647,29.093) 5.809,29.093 5.809,29.506 cw(c5.972,29.506) 5.972,29.668 cw(c5.972,29.506) 6.134,29.506 6.134,29.093 ccw(c6.297,29.093) 6.297,28.93 ccw(c6.297,29.093) 6.459,29.093 6.459,29.506 cw(c6.622,29.506) 6.622,29.668 cw(c6.622,29.506) 6.784,29.506 6.784,29.093 ccw(c6.947,29.093) 6.947,28.93 ccw(c6.947,29.093) 7.109,29.093 7.109,29.506 cw(c7.272,29.506) 7.272,29.668 cw(c7.272,29.506) 7.434,29.506 7.434,29.093 ccw(c7.597,29.093) 7.597,28.93 ccw(c7.597,29.093) 7.759,29.093 7.759,29.506 cw(c7.922,29.506) 7.922,29.668 cw(c7.922,29.506) 8.084,29.506 8.084,29.093 ccw(c8.247,29.093) 8.247,28.93 ccw(c8.247,29.093) 8.409,29.093 8.409,29.506 cw(c8.572,29.506) 8.572,29.668 ; 8.572,29.668 cw(c8.572,29.506) 8.734,29.506 8.734,29.093 ccw(c8.897,29.093) 8.897,28.93 ccw(c8.897,29.093) 9.059,29.093 9.059,29.506 cw(c9.222,29.506) 9.222,29.668 cw(c9.222,29.506) 9.384,29.506 9.384,29.093 ccw(c9.547,29.093) 9.547,28.93 ccw(c9.547,29.093) 9.709,29.093 9.709,29.506 cw(c9.872,29.506) 9.872,29.668 cw(c9.872,29.506) 10.034,29.506 10.034,29.093 ccw(c10.197,29.093) 10.197,28.93 ccw(c10.197,29.093) 10.359,29.093 10.359,29.506 cw(c10.522,29.506) 10.522,29.668 cw(c10.522,29.506) 10.684,29.506 10.684,29.093 ccw(c10.847,29.093) 10.847,28.93 ccw(c10.847,29.093) 11.009,29.093 11.009,29.506 cw(c11.172,29.506) 11.172,29.668 cw(c11.172,29.506) 11.334,29.506 11.334,29.093 ccw(c11.497,29.093) 11.497,28.93 ccw(c11.497,29.093) 11.659,29.093 11.659,29.506 cw(c11.822,29.506) 11.822,29.668 cw(c11.822,29.506) 11.984,29.506 11.984,29.093 ccw(c12.147,29.093) 12.147,28.93 ccw(c12.147,29.093) 12.309,29.093 12.309,29.506 cw(c12.472,29.506) 12.472,29.668 cw(c12.472,29.506) 12.634,29.506 12.634,29.093 ccw(c12.797,29.093) 12.797,28.93 ccw(c12.797,29.093) 12.959,29.093 12.959,29.506 cw(c13.122,29.506) 13.122,29.668 cw(c13.122,29.506) 13.284,29.506 13.284,29.093 ccw(c13.447,29.093) 13.447,28.93 ccw(c13.447,29.093) 13.609,29.093 13.609,29.506 cw(c13.772,29.506) 13.772,29.668 cw(c13.772,29.506) 13.934,29.506 13.934,29.093 ccw(c14.097,29.093) 14.097,28.93 ccw(c14.097,29.093) 14.259,29.093 14.259,29.506 cw(c14.422,29.506) 14.422,29.668 cw(c14.422,29.506) 14.584,29.506 14.584,29.093 ccw(c14.747,29.093) 14.747,28.93 ccw(c14.747,29.093) 14.909,29.093 14.909,29.506 cw(c15.072,29.506) 15.072,29.668 cw(c15.072,29.506) 15.234,29.506 15.234,29.093 ccw(c15.397,29.093) 15.397,28.93 ccw(c15.397,29.093) 15.559,29.093 15.559,29.506 cw(c15.722,29.506) 15.722,29.668 cw(c15.722,29.506) 15.884,29.506 15.884,29.187 ccw(c16.047,29.187) 16.047,29.024 17.997,29.024 ccw(c17.997,29.187) 18.159,29.187 18.159,29.506 cw(c18.322,29.506) 18.322,29.668 cw(c18.322,29.506) 18.484,29.506 18.484,29.093 ccw(c18.647,29.093) 18.647,28.93 ccw(c18.647,29.093) 18.809,29.093 18.809,29.506 cw(c18.972,29.506) 18.972,29.668 cw(c18.972,29.506) 19.134,29.506 19.134,29.187 ccw(c19.297,29.187) 19.297,29.024 19.98,29.024 20.124,28.88 22.804,26.2 28.8,26.2 29.607,25.393 R48.1@29.607,24.964
  other v1: -5.665,28.325
I2C/SMBus_nALERT: J1.C19 P1.C19 R5.1 U6_CON1.3 U6_CON2.3 U7_CON1.3 U7_CON2.3 X1_CON1.62 X1_CON2.62 | length 116.4
  Top Layer w0.125: v1(15.1,52) 14.1,51 14.1,37.517 14.658,36.959 14.658,34.872 16.03,33.499 18.357,33.499 19.764,32.092 20.827,31.029 20.827,29.945 20.813,29.932 20.813,22.089 v1@20.82,22.083 ; v1(18.73,52) X1_CON1.62@19.775,52 ; X1_CON2.62@19.775,22 19.813,22.038 20.774,22.038 v1(20.812,22.076) ; v1(24.933,23.885) 24.933,14.538 28.092,11.379 v1(28.092,9.017) v1(28.092,4.208) ; v1(27.743,57.643) 27.7,57.6 27.7,53.422 27.896,53.225 v1(27.896,53.151) 27.9,53.147 v1(27.9,50.6)
  Bottom Layer w0.125: P1.C19@-5.175,29.595 -4.57,30.2 4.1,30.2 4.366,29.934 v1(20.815,29.934) ; v1(15.1,52) v1(18.73,52) 19.635,52 20.129,52.494 20.179,52.494 20.342,52.332 20.342,52.307 20.663,51.986 20.892,51.986 21.362,51.516 21.362,51.505 21.457,51.409 21.468,51.409 22.277,50.6 v1(27.9,50.6) ; v1(20.812,22.076) 20.812,22.124 22.572,23.885 23.803,23.885 v1(24.933,23.885) ; v1(27.743,57.643) U6_CON1.3@29.606,57.643 U6_CON1.3@29.576,57.672 ; v1(27.896,53.151) 27.922,53.126 29.574,53.126 U7_CON1.3@29.6,53.1 ; v1(28.092,4.208) 28.098,4.202 29.586,4.202 U6_CON2.3@29.592,4.197 ; v1(28.092,9.017) 28.101,9.008 29.524,9.008 U7_CON2.3@29.532,9
  other v1: -5.665,29.595
I2C/SMBus_SCL: J1.G30 P1.G30 R7.1 R19_CON1.1 R19_CON2.1 R20_CON1.1 R20_CON2.1 U6_CON1.5 U6_CON2.5 U7_CON1.5 U7_CON2.5 X1_CON1.60 X1_CON2.60 | length 109.5
  Top Layer w0.125: v1(15.7,51.5) 14.6,50.4 v1(14.6,43.6) 14.6,37.741 14.985,37.356 14.985,35.103 16.213,33.875 18.502,33.875 21.19,31.187 21.19,21.859 v1@20.841,21.509 ; v1(18.72,51.5) X1_CON1.60@19.775,51.5 X1_CON1.60@19.757,51.482 ; X1_CON2.60@19.775,21.5 19.791,21.516 20.819,21.516 v1(20.836,21.533) ; v1(25.311,23.404) 25.311,15.319 28.463,12.167 28.463,7.946 28.992,7.416 28.992,3.792 v1(28.4,3.2) ; v1(27.306,52.116) v1@27.3,52.122 ; v1(27.338,50.191) 27.322,50.207 27.322,52.1 v1@27.3,52.122 ; v1(29.052,59.976) 27.312,58.236 v1(27.312,56.695) 27.3,56.684 v1@27.3,52.122
  Bottom Layer w0.125: P1.G30@-0.095,43.565 -0.031,43.565 0.296,43.892 0.82,43.892 0.975,44.047 4.221,44.047 4.678,43.591 v1@14.6,43.591 ; v1(15.7,51.5) v1(18.72,51.5) 19.422,51.5 R7.1@19.437,51.515 19.462,51.515 19.843,51.134 19.864,51.134 19.87,51.128 20.505,51.128 20.511,51.134 20.966,51.134 21.909,50.191 v1(27.338,50.191) ; v1(20.836,21.533) 22.707,23.404 v1(25.311,23.404) ; v1(27.312,56.695) 27.338,56.669 29.58,56.669 U6_CON1.5@29.606,56.643 ; v1@27.474,52.1 U7_CON1.5@29.6,52.1 ; v1(28.4,3.2) 28.402,3.198 U6_CON2.5@29.592,3.197 U6_CON2.5@29.592,3.197 ; v1(28.463,8) U7_CON2.5@29.532,8 ; R19_CON1.1@28.59,59.982 28.596,59.976 v1(29.052,59.976) R20_CON1.1@29.509,59.976
  other v1: 28.992,6.476 -0.59,43.565
I2C/SMBus_SDA: J1.G31 P1.G31 R6.1 R21_CON1.1 R21_CON2.1 R22_CON1.1 R22_CON2.1 U6_CON1.4 U6_CON2.4 U7_CON1.4 U7_CON2.4 X1_CON1.58 X1_CON2.58 | length 107.5
  Top Layer w0.125: v1(16.2,51) 15.108,49.908 v1(15.108,43.975) 15.108,37.852 15.316,37.644 15.316,35.34 16.504,34.152 18.746,34.152 21.536,31.362 21.536,21.649 20.888,21.001 v1(20.816,21.001) X1_CON2.58@19.775,21 ; v1(18.7,51) X1_CON1.58@19.775,51 ; v1(24.569,22.982) 24.569,13.778 27.613,10.734 v1(27.613,8.519) v1(27.613,3.713) ; v1(28.343,57.143) 29.054,56.431 v1(29.054,55.413) 29.054,53.254 28.377,52.577 28.377,49.854 v1(28.355,49.832)
  Bottom Layer w0.125: P1.G31@-0.095,44.835 0.623,44.117 0.726,44.117 0.882,44.272 4.723,44.272 5.021,43.975 v1(15.108,43.975) ; v1(16.2,51) v1(18.7,51) 18.753,50.947 19.051,50.947 19.385,50.614 R6.1@19.41,50.614 19.435,50.614 20.237,49.811 28.334,49.811 v1(28.355,49.832) ; v1(20.816,21.001) 22.798,22.982 v1(24.569,22.982) ; v1(26.957,11.39) 27.341,11.774 27.995,11.774 28.483,11.287 29.437,11.287 R22_CON2.1@29.444,11.294 ; v1(27.613,3.713) 27.622,3.705 29.583,3.705 U6_CON2.4@29.592,3.697 ; v1(27.613,8.519) 27.623,8.51 29.522,8.51 U7_CON2.4@29.532,8.5 ; v1(28.343,57.143) U6_CON1.4@29.606,57.143 U6_CON1.4@29.605,57.144 ; v1(28.4,52.6) U7_CON1.4@29.6,52.6
  other v1: -0.59,44.835
I2C_SCL: J1.D26 P1.D26 R4.1 U4.6 | length 37.7
  Bottom Layer w0.125: P1.D26@-3.905,38.485 -3.905,38.605 -4.002,38.605 -4.686,39.288 -4.686,41.219 -4.612,41.293 -4.607,41.293 -4.254,41.646 -3.656,41.646 -3.4,41.902 -3.4,42.462 -2.853,43.01 4.227,43.01 4.407,43.189 19.911,43.189 22,41.1 24.966,41.1 25.641,40.425 R4.1@25.666,40.425 25.705,40.465 U4.6@27.6,40.465
  other v1: -4.395,38.485
I2C_SDA: J1.D27 P1.D27 R3.1 U4.5 | length 35.6
  Top Layer w0.125: v1(-4.323,39.755) J1.D27@-3.905,39.755
  Bottom Layer w0.125: P1.D27@-3.905,39.755 -3.4,40.26 -3.4,41.3 -3.06,41.64 -2.46,41.64 -2.1,42 -2.1,42.565 -1.888,42.778 19.759,42.778 22.709,39.828 25.066,39.828 25.632,39.262 R3.1@25.657,39.262 25.724,39.195 U4.5@27.6,39.195
I2S_CLK: J1.C26 P1.C26 U1.3 U2.3 | length 61.2
  Top Layer w0.125: v1(-12.7,8.1) v1(-12.7,39) -12.7,54.448 -11.839,55.309 -11.839,56.486 -11.425,56.9 U1.3@-11.425,57.175 ; v1@-10.575,5.225 v1(-10.575,5.25) U2.3@-10.575,5.825
  Bottom Layer w0.125: v1(-12.7,8.1) -10.575,5.975 v1(-10.575,5.25) ; v1(-12.7,39) -6.18,39 v1(-5.665,38.485)
I2S_OUT: J1.C27 P1.C27 U1.4 U2.4 | length 56.7
  Top Layer w0.125: v1(-12.337,9.937) v1(-12.337,40.237) ; v1(-12.337,40.237) -12.337,54.493 -11.56,55.27 -11.56,55.69 U1.4@-11.425,55.825 ; U2.4@-10.575,7.175 v1(-10.575,7.75) v1@-10.575,7.775
  Bottom Layer w0.125: v1@-12.416,40.237 v1(-12.337,40.237) -6.148,40.237 v1(-5.665,39.755) ; v1(-12.337,9.937) -10.612,8.212 -10.612,7.787 v1(-10.575,7.75)
NetC1_2: C1.2 C2.2 R1.1 U1.1 U1.2 | length 6.6
  Top Layer w0.125: R1.1@-10.625,51 -10.625,52.975 -10.575,53.025 C2.2@-10.565,53.025 ; C2.2@-10.61,53 -10.59,53 -10.43,53.16 -10.43,53.18 -10.113,53.497 -10.113,55.088 -10.575,55.55 U1.1@-10.575,55.825 U1.2@-10.575,57.175
NetC3_2: C3.2 C4.2 R2.1 U2.1 | length 5.3
  Top Layer w0.125: U2.1@-11.425,7.175 -11.425,7.45 -11.9,7.925 -11.9,9.49 -11.57,9.82 -11.57,9.84 -11.41,10 C4.2@-11.39,10 -11.383,10.008 -11.383,11.992 R2.1@-11.375,12